# Altium PCB DIO_8SMA_8MCX.PcbDoc (part 2 of 9)
Units mm, origin at the board's own origin, x right, y up, seen from the top; angles counter-clockwise.
Board outline 222.9 x 100 mm, 6 copper layers (TopLayer, L2, L3, L4, L5, Bottom Layer), stack 1.492 mm thick; 542 components, 326 nets, 1968 pads, 1583 vias.
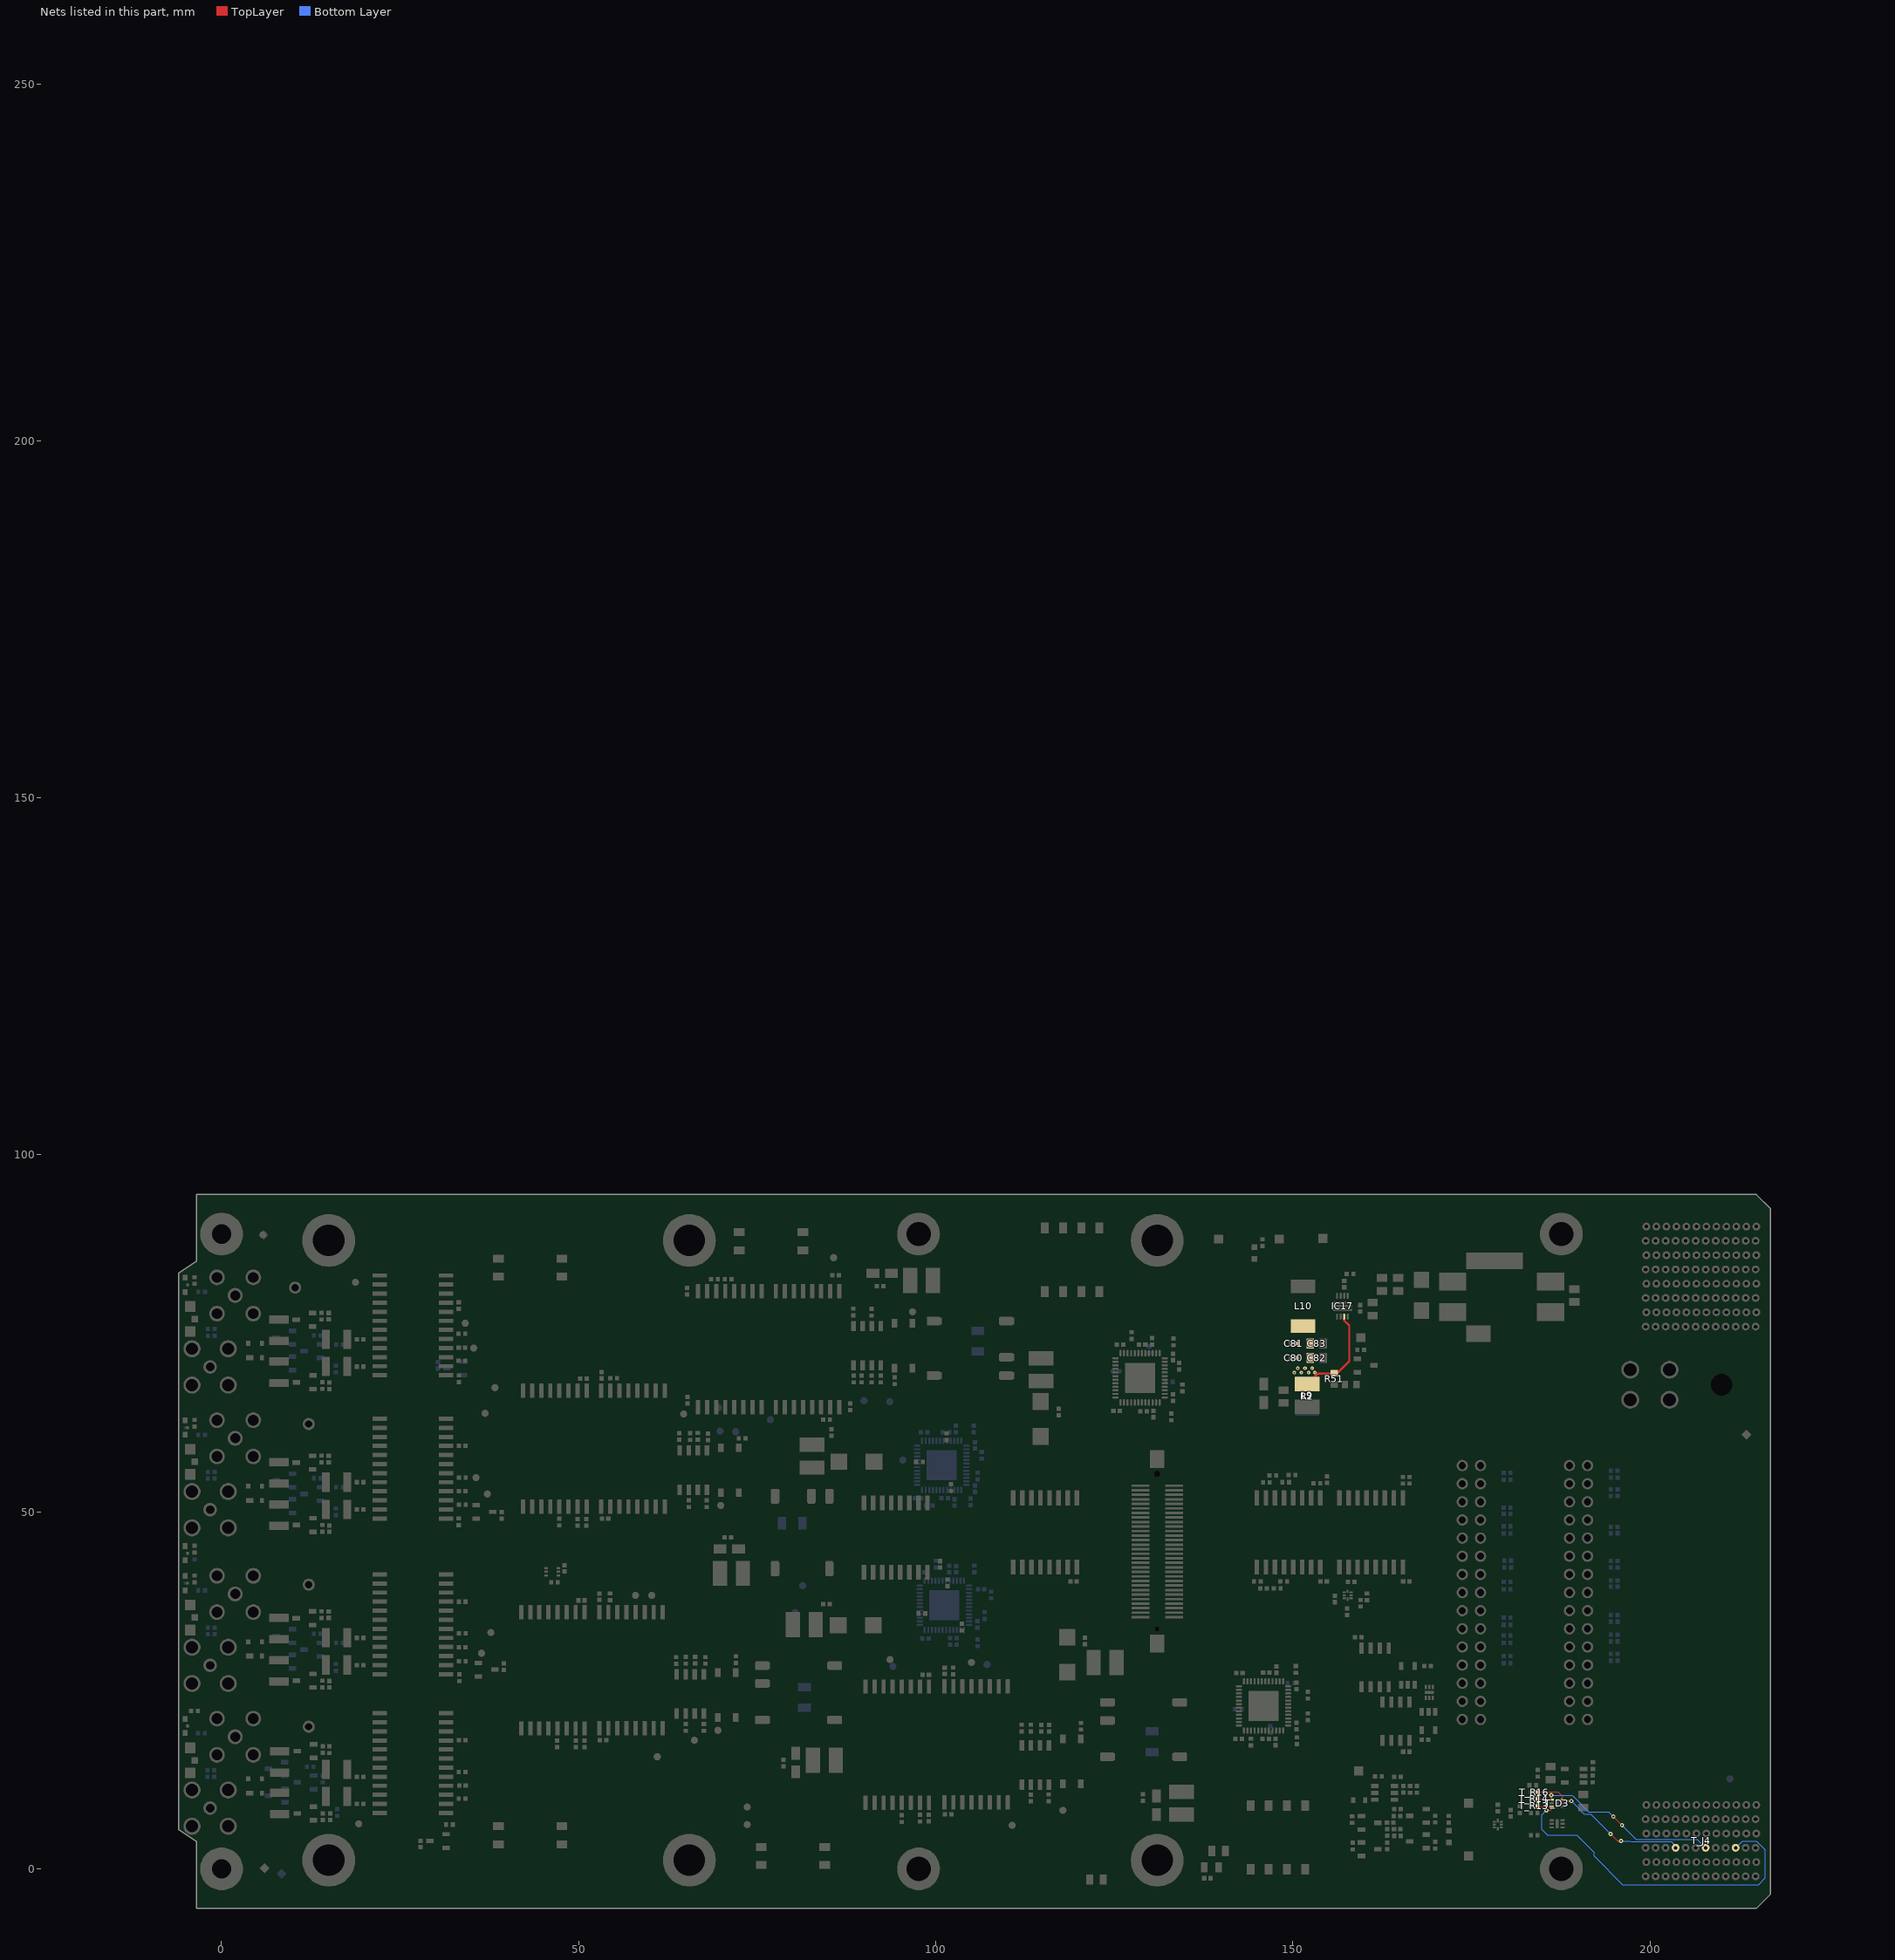
[diagram p6: the nets of this part, all layers, seen from the top]

## Components (designator, comment, footprint, x,y, rotation, side; value= is the part's Value field where it differs from the comment) (continued)
SW5D "Switch" SW_OMRON_A6S-2102-H 80,1.8 r180 top (schematic designator SW5)
T19A "BSS138LT1G" SOT95P240X110-3N 11.6,76.9 r180 top (schematic designator T19)
T19B "BSS138LT1G" SOT95P240X110-3N 11.6,56.9 r180 top (schematic designator T19)
T19C "BSS138LT1G" SOT95P240X110-3N 11.6,35.1 r180 top (schematic designator T19)
T19D "BSS138LT1G" SOT95P240X110-3N 11.744,16.5 r180 top (schematic designator T19)
T20A "BSS138LT1G" SOT95P240X110-3N 11.633,68.15 r180 top (schematic designator T20)
T20B "BSS138LT1G" SOT95P240X110-3N 11.633,48.15 r180 top (schematic designator T20)
T20C "BSS138LT1G" SOT95P240X110-3N 11.633,26.35 r180 top (schematic designator T20)
T20D "BSS138LT1G" SOT95P240X110-3N 11.733,7.75 r180 top (schematic designator T20)
T21A "BSS138LT1G" SOT95P240X110-3N 8.8,70.8 r180 bottom (schematic designator T21)
T21B "BSS138LT1G" SOT95P240X110-3N 8.8,50.8 r180 bottom (schematic designator T21)
T21C "BSS138LT1G" SOT95P240X110-3N 8.8,29 r180 bottom (schematic designator T21)
T21D "BSS138LT1G" SOT95P240X110-3N 7.733,10.25 r180 bottom (schematic designator T21)
T22A "BSS138LT1G" SOT95P240X110-3N 12.7,72.5 r180 bottom (schematic designator T22)
T22B "BSS138LT1G" SOT95P240X110-3N 12.7,52.5 r180 bottom (schematic designator T22)
T22C "BSS138LT1G" SOT95P240X110-3N 12.7,30.7 r180 bottom (schematic designator T22)
T22D "BSS138LT1G" SOT95P240X110-3N 11.742,12.11 r180 bottom (schematic designator T22)
T23A "BSS138LT1G" SOT95P240X110-3N 8.8,74.4 r180 bottom (schematic designator T23)
T23B "BSS138LT1G" SOT95P240X110-3N 8.8,54.4 r180 bottom (schematic designator T23)
T23C "BSS138LT1G" SOT95P240X110-3N 8.8,32.6 r180 bottom (schematic designator T23)
T23D "BSS138LT1G" SOT95P240X110-3N 7.7,14 r180 bottom (schematic designator T23)
T_B1 "Plated Hole" c600h270 0,0 r0 top locked
T_B2 "Plated Hole" c600h270 0,88.9 r0 top locked
T_C1 "4.7uF" CAPC2012X135N 190.7,9.5 r90 top
T_C2 "4.7uF" CAPC2012X135N 186.1,13.4 r270 top
T_C3 "100nF" CAPC1005X55N 168.85,28.4 r180 top
T_C4 "100nF" CAPC1005X55N 159.157,32.411 r0 top
T_C5 "100nF" CAPC1005X55N 168.5,18.1 r180 top
T_C6 "100nF" CAPC1005X55N 165.9,16.4 r0 top
T_C8 "100nF" CAPC1005X55N 47.998,42.086 r270 top
T_C9 "10uF" CAPC2012X95N 162.5,81.85 r270 top
T_C10 "10uF" CAPC2012X95N 164.75,81.85 r270 top
T_C11 "10uF" CAPC2012X95N 189.4,80.3 r270 top
T_C12 "22pF" CAPC1005X55N 138.046,-1.314 r0 top
T_C13 "10nF" CAPC1005X55N 165.467,11.15 r90 top
T_C14 "100nF" CAPC1005X55N 163.2,5.1 r90 top
T_C15 "100nF" CAPC1005X55N 163.634,6.48 r0 top
T_C16 "10nF" CAPC1005X55N 164.655,8.355 r180 top
T_C17 "10nF" CAPC1005X55N 164.6,7.4 r180 top
T_C18 "10nF" CAPC1005X55N 164.609,5.548 r180 top
T_C19 "10nF" CAPC1005X55N 164.64,4.613 r180 top
T_C20 "100nF" CAPC1005X55N 164.648,12.89 r180 top
T_C21 "100nF" CAPC1005X55N 163.2,3.2 r90 top
T_C22 "100nF" CAPC1005X55N 178.7,8.507 r270 top
T_C23 "100nF" CAPC1005X55N 180.5,7.8 r270 top
T_C24 "100nF" CAPC1005X55N 155.875,37.8 r90 top
T_C25 "100nF" CAPC1005X55N 157.6,36 r90 top
T_D1 "UCLAMP3305P.TCT" SON50P160X65_HS-7N 169.1,24.7 r270 top
T_D2 "UCLAMP3305P.TCT" SON50P160X65_HS-7N 187,6.3 r0 top
T_D3 "UCLAMP3305P.TCT" SON50P160X65_HS-7N 187,9.2 r0 top
T_D5 "SMBJ12A" DIOM5336X265N 168,80.35 r90 top
T_D6 "CDBU0520-HF" SOD-523F 159.286,9.624 r0 top
T_FL1 "10A/50VDC" FIL_MURATA_BNX02 179.245,80.068 r180 top
T_IC1 "TPS70933DBV" SOT95P280X145-5N 189.398,13.032 r180 top
T_IC2 "24AA02E48T-I/OT" SOT95P280X145-5N 166.1,27.1 r90 top
T_IC3 "24AA025E48-I/SN" SOIC127P600X175-8N 161.525,28.2 r90 top
T_IC4 "24AA02E48T-I/OT" SOT95P280X145-5N 169,20.7 r270 top
T_IC5 "24AA025E48-I/SN" SOIC127P600X175-8N 164.43,20.675 r270 top
T_IC6 "TMP112DQDRLRQ1" SOTFL50P160X60-6N 46.3,41.6 r0 top
T_IC7 "TPS3808G01DBVT" SOT95P280X145-6N 162.85,10.633 r0 top
T_IC8 "FXMA2102UMX" FXMA2102UMX 178.7,6.2 r270 top
T_IC9 "FXMA2102UMX" FXMA2102UMX 157.675,38.3 r90 top
T_J1 "" 3M_N2530-6002RB 190,38.7 r270 top locked
T_J2 "" 3M_N2530-6002RB 175,38.7 r270 top locked
T_J4 "P1" AMPHENOL_10052825-101LF 207.15,3.95 r90 top locked
T_J5 "P6" AMPHENOL_10052838-101LF 207.153,82.95 r90 top
T_J6 "Mini-Fit Jr.™" MOLEX_39-30-0040 200,67.8 r270 top
T_LD1 "Red" LED_AVAGO_HSMC-C120 -5.1,44.2 r90 top
T_LD2 "Green" LED_AVAGO_HSME-C120#1 -5.1,44.2 r270 bottom locked
T_LD3 "Green" LED_KINGBRIGHT_KPH-1608CGCK 144.6,86.275 r90 top
T_LD4 "Green" LED_KINGBRIGHT_KPH-1608CGCK 171.844,4.512 r90 top
T_M1 "PTH_3.4X6_BTKO" PTH-M3.4x6.0_BTKO 97.6,88.9 r180 top locked
T_M2 "PTH_3.4X6_BTKO" PTH-M3.4x6.0_BTKO 187.6,88.9 r180 top locked
T_M3 "PTH_3.4X6_BTKO" PTH-M3.4x6.0_BTKO 97.6,0 r0 top
T_M4 "PTH_3.4X6_BTKO" PTH-M3.4x6.0_BTKO 187.6,0 r0 top locked
T_R1 "1k6" RESC1005X40N -3.8,44.8 r270 top
T_R2 "0" RESC1005X40N 184.3,13.4 r90 top
T_R3 "10k" RESC1005X40N -3.8,43.8 r270 bottom
T_R4 "10k" RESC1005X40N 192,12.6 r90 top
T_R5 "1k6" RESC1005X40N 145.734,87.705 r90 top
T_R6 "1k6" RESC1005X40N 171.833,6.95 r90 top
T_R7 "3k9" RESC1005X40N 192.018,14.463 r270 top
T_R8 "10k" RESC1005X40N 161.979,12.923 r0 top
T_R13 "22" RESC1005X40N 183.8,8.8 r0 top
T_R14 "22" RESC1005X40N 183.8,9.8 r0 top
T_R15 "22" RESC1005X40N 183.8,4.7 r0 top
T_R16 "22" RESC1005X40N 183.804,10.726 r0 top
T_R17 "22" RESC1005X40N 183.8,7.8 r0 top
T_R18 "22" RESC1005X40N 183.6,11.7 r0 top
T_R19 "200" RESC1005X40N 181.8,8.3 r270 top
T_R25 "0" RESC1005X40N 46.609,40.119 r0 top
T_R26 "1M1" RESC2012X60N 138.6,0.2 r0 top
T_R27 "10M" RESC2113X55N 139.6,2.5 r0 top
T_R28 "10M" RESC2113X55N 122.5,-1.5 r0 top
T_R29 "100k" RESC1005X40N 167.357,11.132 r270 top
T_R30 "3k9" RESC1005X40N 166.419,11.14 r270 top
T_R31 "10k" RESC1005X40N 169.936,6.966 r90 top
T_R32 "10k" RESC1005X40N 169.955,3.32 r90 top
T_R33 "10k" RESC1005X40N 158.4,3.2 r270 top
T_R34 "10k" RESC1005X40N 158.3,6.9 r270 top
T_R35 "0" RESC1005X40N 195,55.75 r180 bottom
T_R36 "0" RESC1005X40N 194.997,53.121 r180 bottom
T_R37 "0" RESC1005X40N 195,47.9 r180 bottom
T_R38 "0" RESC1005X40N 195,42.2 r180 bottom
T_R39 "0" RESC1005X40N 195,40.4 r180 bottom
T_R40 "0" RESC1005X40N 195,34.6 r180 bottom
T_R41 "0" RESC1005X40N 195,32.8 r180 bottom
T_R42 "0" RESC1005X40N 195,30.116 r180 bottom
T_R43 "0" RESC1005X40N 180,55.476 r180 bottom
T_R44 "0" RESC1005X40N 180,49.7 r180 bottom
T_R45 "0" RESC1005X40N 180,47.976 r180 bottom
T_R46 "0" RESC1005X40N 180.1,42.2 r180 bottom
T_R47 "0" RESC1005X40N 180,40.176 r180 bottom
T_R48 "0" RESC1005X40N 180,34.176 r180 bottom
T_R49 "0" RESC1005X40N 180,32.676 r180 bottom
T_R50 "0" RESC1005X40N 180,29.8 r0 bottom
T_R51 "0" RESC1005X40N 195,54.8 r180 bottom
T_R52 "0" RESC1005X40N 195,52.2 r180 bottom
T_R53 "0" RESC1005X40N 195,47 r180 bottom
T_R54 "0" RESC1005X40N 195,43.125 r180 bottom
T_R55 "0" RESC1005X40N 195,39.5 r180 bottom
T_R56 "0" RESC1005X40N 195,35.55 r180 bottom
T_R57 "0" RESC1005X40N 194.995,31.858 r180 bottom
T_R58 "0" RESC1005X40N 195.005,29.168 r180 bottom
T_R59 "0" RESC1005X40N 180,54.476 r180 bottom
T_R60 "0" RESC1005X40N 180,50.6 r180 bottom
T_R61 "0" RESC1005X40N 180,46.976 r180 bottom
T_R62 "0" RESC1005X40N 180.1,43.15 r180 bottom
T_R63 "0" RESC1005X40N 180,39.176 r180 bottom
T_R64 "0" RESC1005X40N 180,35.176 r180 bottom
T_R65 "0" RESC1005X40N 180,31.626 r180 bottom
T_R66 "0" RESC1005X40N 180,28.8 r0 bottom
T_R67 "10k" RESC1005X40N 159.475,37.2 r90 top
T_R68 "10k" RESC1005X40N 160.375,38.1 r270 top
T_R69 "10k" RESC1005X40N 158.175,40.2 r180 top
T_T1 "BSS138LT1G" SOT95P240X110-3N 160.2,70.5 r0 top
T_T2 "BSS138LT1G" SOT95P240X110-3N 167.518,7.428 r180 top
T_T3 "BSS138LT1G" SOT95P240X110-3N 167.532,3.85 r180 top
T_T4 "BSS138LT1G" SOT95P240X110-3N 160.768,2.75 r0 top
T_T5 "BSS138LT1G" SOT95P240X110-3N 160.768,6.45 r0 top
T_TP1 "Test Point" TPS127 139.6,88.2 r0 top
T_TP2 "Test Point" TPS127 148.1,88.2 r0 top
T_TP3 "Test Point" TPS127 174.6,9.2 r90 top
T_TP4 "Test Point" TPS127 159.5,74.4 r90 top
T_TP5 "Test Point" TPS127 154.2,88.3 r0 top
T_TP6 "Test Point" TPS127 174.6,1.8 r90 top
T_TP8 "Test Point" TPS127 159.2,13.7 r90 top
TP1A "Plated Hole" c150h100 10.3,81.4 r90 top (schematic designator TP1)
TP1B "Plated Hole" c150h100 12.2,62.3 r90 top (schematic designator TP1)
TP1C "Plated Hole" c150h100 12.2,39.8 r90 top (schematic designator TP1)
TP1D "Plated Hole" c150h100 12.2,19.9 r90 top (schematic designator TP1)
U1 "PCF8574ADWR" DW0016A_M 115.3,47.1 r270 top
U2 "PCF8574ADWR" DW0016A_M 160.968,47.1 r270 top
U3 "PCF8574ADWR" DW0016A_M 94.4,46.4 r270 top
U4 "PCF8574ADWR" DW0016A_M 149.4,47.1 r270 top

## Footprints (in the part's own frame and the unit in brackets; to place one, negate y for a bottom-side part, rotate by r counter-clockwise, add the part's x,y. Pads: shape width x height; smd on the part's side, far side on the other; paste and mask are expansions set on the pad)
3M_N2530-6002RB [mm] "30 Contacts - Straight .100\" x .100\" Low Profile Four-Wall Header"
  round 1.6 hole 1: 1(-17.78,-1.27) 2(-17.78,1.27) 3(-15.24,-1.27) 4(-15.24,1.27) 5(-12.7,-1.27) 6(-12.7,1.27) 7(-10.16,-1.27) 8(-10.16,1.27) 9(-7.62,-1.27) 10(-7.62,1.27) 11(-5.08,-1.27) 12(-5.08,1.27) 13(-2.54,-1.27) 14(-2.54,1.27) 15(0,-1.27) 16(0,1.27) 17(2.54,-1.27) 18(2.54,1.27) 19(5.08,-1.27) 20(5.08,1.27) 21(7.62,-1.27) 22(7.62,1.27) 23(10.16,-1.27) 24(10.16,1.27) 25(12.7,-1.27) 26(12.7,1.27) 27(15.24,-1.27) 28(15.24,1.27) 29(17.78,-1.27) 30(17.78,1.27)
  silkscreen extent -22.71,-4.85 22.71,4.52, body extent -22.71,-4.11 22.71,4.52, height 9.91
9774120360 [mm] "SMT Steel Spacer with internal Thread M3, height 12mm"
  round 7.4 / inner round 0 / far side round 0 hole 4.4 unplated: 1(0,0)
  body extent -3,-3 3,3, height 12
AMPHENOL_919-383J-51A [mm] "50 Ohm, RF Connector, MCX Right Angle PCB Receptacle Jack"
  round 1.9 hole 1.2: 1(0,0)
  round 2.4 hole 1.7: 2(-2.54,2.54) 2(-2.54,-2.54) 2(2.54,2.54) 2(2.54,-2.54)
  silkscreen extent -3,-3 6.5,3, body extent -3,-3 6.5,3, height 6
AMPHENOL_10052825-101LF [mm] "72 Contacts, 2mm Pitch, 6 Columns, 4 Pairs per Column, 4 Walls, Right Angle Header"
  round 1.1 hole 0.5: A1(-5,-7.65) A2(-3,-7.75) A3(-1,-7.65) A4(1,-7.75) A5(3,-7.65) A6(5,-7.75) B1(-5,-6.25) B2(-3,-6.35) B3(-1,-6.25) B4(1,-6.35) B5(3,-6.25) B6(5,-6.35) C1(-5,-4.85) C2(-3,-4.95) C3(-1,-4.85) C4(1,-4.95) C5(3,-4.85) C6(5,-4.95) D1(-5,-3.45) D2(-3,-3.55) D3(-1,-3.45) D4(1,-3.55) D5(3,-3.45) D6(5,-3.55) E1(-5,-2.05) E2(-3,-2.15) E3(-1,-2.05) E4(1,-2.15) E5(3,-2.05) E6(5,-2.15) F1(-5,-0.65) F2(-3,-0.75) F3(-1,-0.65) F4(1,-0.75) F5(3,-0.65) F6(5,-0.75) G1(-5,0.75) G2(-3,0.65) G3(-1,0.75) G4(1,0.65) G5(3,0.75) G6(5,0.65) H1(-5,2.15) H2(-3,2.05) H3(-1,2.15) H4(1,2.05) H5(3,2.15) H6(5,2.05) I1(-5,3.55) I2(-3,3.45) I3(-1,3.55) I4(1,3.45) I5(3,3.55) I6(5,3.45) J1(-5,4.95) J2(-3,4.85) J3(-1,4.95) J4(1,4.85) J5(3,4.95) J6(5,4.85) K1(-5,6.35) K2(-3,6.25) K3(-1,6.35) K4(1,6.25) K5(3,6.35) K6(5,6.25) L1(-5,7.75) L2(-3,7.65) L3(-1,7.75) L4(1,7.65) L5(3,7.75) L6(5,7.65)
  silkscreen extent -6.95,-21.95 6.95,11.85, body extent -6.95,-21.95 6.95,11.85, height 15.25
AMPHENOL_10052838-101LF [mm] "96 Contacts, 2mm Pitch, 8 Columns, 4 Pairs per Column, 4 Walls, Right Angle Header"
  round 1.1 hole 0.5: A1(-7,-7.65) A2(-5,-7.75) A3(-3,-7.65) A4(-1,-7.75) A5(1,-7.65) A6(3,-7.75) A7(5,-7.65) A8(7,-7.75) B1(-7,-6.25) B2(-5,-6.35) B3(-3,-6.25) B4(-1,-6.35) B5(1,-6.25) B6(3,-6.35) B7(5,-6.25) B8(7,-6.35) C1(-7,-4.85) C2(-5,-4.95) C3(-3,-4.85) C4(-1,-4.95) C5(1,-4.85) C6(3,-4.95) C7(5,-4.85) C8(7,-4.95) D1(-7,-3.45) D2(-5,-3.55) D3(-3,-3.45) D4(-1,-3.55) D5(1,-3.45) D6(3,-3.55) D7(5,-3.45) D8(7,-3.55) E1(-7,-2.05) E2(-5,-2.15) E3(-3,-2.05) E4(-1,-2.15) E5(1,-2.05) E6(3,-2.15) E7(5,-2.05) E8(7,-2.15) F1(-7,-0.65) F2(-5,-0.75) F3(-3,-0.65) F4(-1,-0.75) F5(1,-0.65) F6(3,-0.75) F7(5,-0.65) F8(7,-0.75) G1(-7,0.75) G2(-5,0.65) G3(-3,0.75) G4(-1,0.65) G5(1,0.75) G6(3,0.65) G7(5,0.75) G8(7,0.65) H1(-7,2.15) H2(-5,2.05) H3(-3,2.15) H4(-1,2.05) H5(1,2.15) H6(3,2.05) H7(5,2.15) H8(7,2.05) I1(-7,3.55) I2(-5,3.45) I3(-3,3.55) I4(-1,3.45) I5(1,3.55) I6(3,3.45) I7(5,3.55) I8(7,3.45) J1(-7,4.95) J2(-5,4.85) J3(-3,4.95) J4(-1,4.85) J5(1,4.95) J6(3,4.85) J7(5,4.95) J8(7,4.85) K1(-7,6.35) K2(-5,6.25) K3(-3,6.35) K4(-1,6.25) K5(1,6.35) K6(3,6.25) K7(5,6.35) K8(7,6.25) L1(-7,7.75) L2(-5,7.65) L3(-3,7.75) L4(-1,7.65) L5(1,7.75) L6(3,7.65) L7(5,7.75) L8(7,7.65)
  silkscreen extent -8.95,-21.95 8.95,11.85, body extent -8.95,-21.95 8.95,11.85, height 15.25
APBA3010SURKSGC-F01 [mm]
  rect 1.5x1.5 smd: 1(1.75,0) 3(-1.75,0)
  rect 0.9x0.9 smd: 2(0,-0.65)
  silkscreen extent -2.5,-1.3 0.5,0.5, body extent -1.5,-0.5 1.5,1.5, height 1.02
C100 [mm] "1mm Diameter SMD Pad"
  round 1 smd paste-0.5: 1(0,0)
c150h100 [mm] "Plated Through Hole: Hole Dia.=1mm Pad Dia.=1.5mm, IPC-7251 Level C"
  round 1.7 hole 1: 1(0,0)
  silkscreen extent -1.2,-1.2 1.2,1.2
c600h270 [mm] "Plated Through Hole: Hole Dia.=2.7mm Pad Dia.=6.0mm"
  round 6 hole 2.7: 1(0,0)
CAPC1005X55N [mm] "Capacitor, Non-Polarized, Chip; 1.00mm L X 0.50mm W X 0.70mm H, IPC Medium Density"
  rect 0.62x0.62 smd: 1(-0.45,0) 2(0.45,0)
  body extent -0.52,-0.27 0.53,0.28, height 0.55
CAPC2012X95N [mm] "Chip Capacitor, Body 2.0x1.25mm, IPC Medium Density"
  rect 1.1x1.45 smd: 1(-0.9,0) 2(0.9,0)
  silkscreen extent 0,-0.58 0,0.58, body extent -1.05,-0.67 1.05,0.68, height 0.95
CAPC2012X135N [mm] "Chip Capacitor, Body 2.0x1.25mm, IPC Medium Density"
  rect 1.05x1.4 smd: 1(-0.9,0) 2(0.9,0)
  silkscreen extent 0,-0.57 0,0.58, body extent -1.05,-0.67 1.05,0.68, height 1.25
CAPMP3216X180N [mm] "Capacitor, Polarized, Molded  Body 3.2x1.6mm, IPC Medium Density"
  rect 1.8x1.25 smd: 1(-1.3,0) 2(1.3,0)
  silkscreen extent -2.4,-0.7 0,1.25, body extent -1.7,-0.9 1.7,0.9, height 1.6
CAPMP6032X280N [mm] "Capacitor, Polarized, Molded  Body 6.0x3.2mm, IPC Medium Density"
  rect 2.35x2.25 smd: 1(-2.45,0) 2(2.45,0)
  silkscreen extent -3.8,-1.75 3.15,1.9, body extent -3.15,-1.75 3.15,1.75, height 2.8
Delock_65848 [mm] "SMA Connector Delock 65848"
  round 2.1 hole 1.4: 1(0,0)
  round 2.2 hole 1.5: 2(-2.54,-2.54) 2(-2.54,2.54) 2(2.54,-2.54) 2(2.54,2.54)
  silkscreen extent -19.1,-4 3,4, body extent -19,-3.13 3,3.13, height 9.13
DIOM5336X265N [mm] "DO-214-AA/SMB Diode, Molded Body; 5.34mm L X 3.625mm W X 2.65mm H, IPC Medium Density"
  rect 2.3x2.15 smd: 1(-2.15,0) 2(2.15,0)
  silkscreen extent -3.92,-1.8 2.65,1.8, body extent -2.7,-1.95 2.7,1.95, height 2.4
DW0016A_M [mm] "SOIC, 16-Leads, Body 10.5x7.6mm, Pitch 1.27mm, IPC Low Density"
  rrect15% 2.1x0.65 smd: 1(-4.85,4.445) 2(-4.85,3.175) 3(-4.85,1.905) 4(-4.85,0.635) 5(-4.85,-0.635) 6(-4.85,-1.905) 7(-4.85,-3.175) 8(-4.85,-4.445) 9(4.85,-4.445) 10(4.85,-3.175) 11(4.85,-1.905) 12(4.85,-0.635) 13(4.85,0.635) 14(4.85,1.905) 15(4.85,3.175) 16(4.85,4.445)
  silkscreen extent -4.97,-5.25 3.4,5.45, body extent -5.14,-5.13 5.14,5.13, height 2.5
FIDUCIAL_TOP_C100-200 [mm] "Round Fiducial Target, Top Layer, 1.0mm, Top Solder 2.0mm, Keepout =2.0mm"
  round 1 smd paste-0.51 mask+0.5: 1(0,0)
  TopLayer keep-out circle w0.1: c0,0 r1
FIDUCIAL_TOP_S100-200 [mm] "Square Fiducial Target, Top Layer, 1.0mm, Top Solder 2.0mm, Keepout =2.0mm"
  rect 1x1 smd rot 45 paste-0.51 mask+0.5: 1(0,0)
  TopLayer keep-out region: 1.414,0 0,-1.414 -1.414,0 0,1.414
FIL_MURATA_BNX02 [mm] "Block Type EMIFIL LC Combined Type, BNX02* Series"
  rect 3.8x2.5 smd: 1(-6.85,2.1) 2(6.85,2.1) 3(-6.85,-2.2) 4(6.85,-2.2)
  rect 7.9x2.3 smd: 4(1,-5.1)
  rect 3.4x2.3 smd: 4(3.25,5.1)
  silkscreen extent -5.95,-4.45 7.77,5.05, body extent -6.05,-4.55 6.05,4.55, height 3.1
FP-52901-0674-MFG [mm]
  rect 0.35x2.5 smd paste+0 mask+0: 1(-9.207,-2.35) 2(-9.207,2.35) 3(-8.572,-2.35) 4(-8.572,2.35) 5(-7.938,-2.35) 6(-7.938,2.35) 7(-7.302,-2.35) 8(-7.302,2.35) 9(-6.667,-2.35) 10(-6.667,2.35) 11(-6.032,-2.35) 12(-6.033,2.35) 13(-5.397,-2.35) 14(-5.398,2.35) 15(-4.762,-2.35) 16(-4.763,2.35) 17(-4.127,-2.35) 18(-4.128,2.35) 19(-3.492,-2.35) 20(-3.493,2.35) 21(-2.857,-2.35) 22(-2.858,2.35) 23(-2.222,-2.35) 24(-2.223,2.35) 25(-1.587,-2.35) 26(-1.588,2.35) 27(-0.952,-2.35) 28(-0.953,2.35) 29(-0.317,-2.35) 30(-0.318,2.35) 31(0.318,-2.35) 32(0.317,2.35) 33(0.953,-2.35) 34(0.952,2.35) 35(1.588,-2.35) 36(1.587,2.35) 37(2.223,-2.35) 38(2.222,2.35) 39(2.858,-2.35) 40(2.857,2.35) 41(3.493,-2.35) 42(3.492,2.35) 43(4.128,-2.35) 44(4.127,2.35) 45(4.763,-2.35) 46(4.762,2.35) 47(5.398,-2.35) 48(5.397,2.35) 49(6.033,-2.35) 50(6.032,2.35) 51(6.667,-2.35) 52(6.667,2.35) 53(7.302,-2.35) 54(7.302,2.35) 55(7.938,-2.35) 56(7.938,2.35) 57(8.572,-2.35) 58(8.572,2.35) 59(9.207,-2.35) 60(9.207,2.35)
  rect 2.5x2 smd paste+0 mask+0: MECH1(-12.91,0) MECH2(12.91,0)
  round 0.9 hole 0.9 unplated paste-2539.97 mask+0: ""(-10.86,0)
  round 0.7 hole 0.7 unplated paste-2539.97 mask+0: ""(10.86,0)
  silkscreen extent -13.58,-4.35 13.58,3.3, body extent -14.26,-3.7 14.26,3.7, height 0.25
FXMA2102UMX [mm]
  rect 0.55x0.25 smd: 1(-0.53,0)
  rect 0.25x0.45 smd: 2(-0.4,-0.475) 3(0,-0.475) 4(0.4,-0.475) 6(0.4,0.475) 7(0,0.475) 8(-0.4,0.475)
  rect 0.45x0.25 smd: 5(0.58,0)
  silkscreen extent -1.1,-0.05 -1,0.05, body extent -0.71,-0.61 0.71,0.61, height 0.5
IND_MURATA-PS_8400 [mm] "Miniature Surface Mount Power Inductors, 4.5mm L X 3.3mm W X 2.9mm H, MURATA 8400 Series"
  rect 2x3.5 smd: 1(-1.6,0) 2(1.6,0)
  silkscreen extent -0.3,-1.8 0.3,1.8, body extent -2.4,-1.8 2.4,1.8, height 2.9
IND_TDK_SPM6530 [mm] "SMD Inductor, 7.1mm L X 6.5mm W X 3mm H, TDK SPM6530 Series"
  rect 1.85x3.4 smd: 1(-2.775,0) 2(2.775,0)
  silkscreen extent -3.5,-3.2 3.5,3.2, body extent -3.6,-3.2 3.6,3.2, height 3.1
LED_AVAGO_HSMC-C120 [mm] "Red Chip LED, 2-Leads, Body 1.7x1.1mm, Side Emitting Package"
  rect 0.8x0.7 smd: 1(-1,0) 2(1,0)
  rect 0.4x0.4 smd: 3(0,-0.35)
  silkscreen extent -1.12,-0.92 0.42,0.8, body extent -0.85,-0.3 0.85,0.8, height 0.7
LED_AVAGO_HSME-C120#1 [mm] "Green Chip LED, 2-Leads, Body 1.7x1.1mm, Side Emitting Package"
  rect 0.8x0.7 smd: 1(-1,0) 2(1,0)
  rect 0.4x0.4 smd: 3(0,-0.35)
  silkscreen extent -1.12,-0.92 0.42,0.8, body extent -0.85,-0.3 0.85,0.8, height 0.7
LED_AVAGO_HSME-C120#2 [mm] "Green Chip LED, 2-Leads, Body 1.7x1.1mm, Side Emitting Package"
  rect 0.8x0.7 smd: 1(-1,0) 2(1,0)
  rect 0.4x0.4 smd: 3(0,0)
  silkscreen extent -1.12,-0.92 0.42,0.8, body extent -0.85,-0.3 0.85,0.8, height 0.7
LED_KINGBRIGHT_KPH-1608CGCK [mm] "SMT Green LED, Case 0603, Body L 1.6 x W 0.8mm H 0.65mm"
  rect 0.8x0.8 smd: 1(-0.825,0) 2(0.825,0)
  silkscreen extent -1.82,-0.4 0.08,0.4, body extent -0.8,-0.4 0.8,0.4, height 0.65
MOLEX_39-30-0040 [mm] "4.20mm (.165\") Pitch Mini-Fit Jr. Header, Dual Row, Right Angle with Snap-in Plastic Peg PCB Lock, 4 Circuits"
  round 2.5 hole 1.8: 1(-2.1,2.75) 2(2.1,2.75) 3(-2.1,-2.75) 4(2.1,-2.75)
  round 1 hole 3 unplated mask+1: 5(0,10.05)
  silkscreen extent -5.2,-1.24 4.8,16.65, body extent -5.2,-3.28 4.8,16.65, height 11.4
PTH-M3.4x6.0_BTKO [mm]
  round 6 hole 3.4: 1(0,0)
  Bottom Layer keep-out region: -5,-3.05 -5,7.3 5,7.3 5,-3.05 1.173,-3.05 1.173,-3.056 2.504,-2.108 3.211,-0.635 3.118,0.997 2.247,2.38 0.817,3.169 -0.817,3.169 -2.247,2.38 -3.118,0.997 -3.211,-0.635 -2.504,-2.108 -1.173,-3.056 -1.173,-3.056 -1.173,-3.05
QFN50P700X700X100-49N-S420 [mm] "QFN, 0.50mm Pitch, Square; 48 Pin, 7.00mm L X 7.00mm W X 1mm H body (W/Thermal Tab 4.2mm X 4.2mm), IPC Medium Density"
  oval 0.9x0.3 smd: 1(-3.45,2.75) 2(-3.45,2.25) 3(-3.45,1.75) 4(-3.45,1.25) 5(-3.45,0.75) 6(-3.45,0.25) 7(-3.45,-0.25) 8(-3.45,-0.75) 9(-3.45,-1.25) 10(-3.45,-1.75) 11(-3.45,-2.25) 12(-3.45,-2.75) 25(3.45,-2.75) 26(3.45,-2.25) 27(3.45,-1.75) 28(3.45,-1.25) 29(3.45,-0.75) 30(3.45,-0.25) 31(3.45,0.25) 32(3.45,0.75) 33(3.45,1.25) 34(3.45,1.75) 35(3.45,2.25) 36(3.45,2.75)
  oval 0.3x0.9 smd: 13(-2.75,-3.45) 14(-2.25,-3.45) 15(-1.75,-3.45) 16(-1.25,-3.45) 17(-0.75,-3.45) 18(-0.25,-3.45) 19(0.25,-3.45) 20(0.75,-3.45) 21(1.25,-3.45) 22(1.75,-3.45) 23(2.25,-3.45) 24(2.75,-3.45) 37(2.75,3.45) 38(2.25,3.45) 39(1.75,3.45) 40(1.25,3.45) 41(0.75,3.45) 42(0.25,3.45) 43(-0.25,3.45) 44(-0.75,3.45) 45(-1.25,3.45) 46(-1.75,3.45) 47(-2.25,3.45) 48(-2.75,3.45)
  rect 4.2x4.2 smd: 49(0,0)
  silkscreen extent -4.02,-3.5 3.5,3.59, body extent -3.5,-3.5 3.5,3.5, height 1
R1SE-1205_H2-R [mm]
  rect 1.2x1.8 smd: 1(-3.81,-5.1) 2(-1.27,-5.1) 4(3.81,-5.1) 5(3.81,5.1) 8(-3.81,5.1)
  silkscreen extent -6.38,-6.8 6.38,5.35, body extent -6.38,-5.55 6.38,5.55, height 6.95
RESC1005X40N [mm] "Chip Resistor, EIA 0402, Metric 1005, Body 1.0x0.5mm, IPC Medium Density"
  rect 0.58x0.62 smd: 1(-0.47,0) 2(0.47,0)
  body extent -0.52,-0.27 0.53,0.28, height 0.4
RESC1608X55N [mm] "Chip Resistor, EIA 0603, Metric 1608, Body 1.6x0.8mm, IPC Medium Density"
  rect 0.9x1 smd: 1(-0.8,0) 2(0.8,0)
  body extent -0.87,-0.47 0.88,0.48, height 0.55
RESC2012X60N [mm] "Chip Resistor, EIA 0805, Metric 2012, Body 2.0x1.2mm, IPC Medium Density"
  rect 0.95x1.4 smd: 1(-1,0) 2(1,0)
  silkscreen extent 0,-0.55 0,0.55, body extent -1.1,-0.67 1.1,0.68, height 0.6
RESC2113X55N [mm] "Chip Resistor, EIA 0805, Metric 2113, Body 2.05x1.3mm, IPC Medium Density"
  rect 1x1.45 smd: 1(-0.95,0) 2(0.95,0)
  silkscreen extent 0,-0.55 0,0.55, body extent -1,-0.62 1,0.63, height 0.55
RESC3216X65N [mm] "Chip Resistor, EIA 1206, Metric 3216, Body 3.2x1.6mm, IPC Medium Density"
  rect 1.15x1.8 smd: 1(-1.45,0) 2(1.45,0)
  silkscreen extent -0.5,-0.8 0.5,0.8, body extent -1.67,-0.87 1.68,0.88, height 0.65
RESC3225X70N [mm] "Chip Resistor, EIA 1210, Metric 3225, Body 3.2x2.5mm, IPC Medium Density"
  rect 1.15x2.7 smd: 1(-1.5,0) 2(1.5,0)
  silkscreen extent -0.55,-1.25 0.55,1.25, body extent -1.7,-1.35 1.7,1.35, height 0.7
RESC4532X70N [mm]
  rect 1.15x3.4 smd: 1(-2.15,0) 2(2.15,0)
  silkscreen extent -1.15,-1.7 1.15,1.7, body extent -2.35,-1.7 2.35,1.7, height 0.7
SOD-523F [mm] "Small Outline Diode Flat Lead (SOD-523F), Body; 1.80mm L X 1mm W X 0.85mm H"
  rect 0.6x0.8 smd: 1(-0.85,0) 2(0.85,0)
  silkscreen extent -1.87,-0.5 0.2,0.52, body extent -0.91,-0.5 0.89,0.5, height 0.85
SOIC127P594X363-8N [mm] "SOIC, 1.27mm pitch; 8  pin, 3.91mm W X 4.88mm L, IPC Medium Density"
  rect 1.45x0.65 smd: 1(-2.75,1.905) 2(-2.75,0.635) 3(-2.75,-0.635) 4(-2.75,-1.905) 5(2.75,-1.905) 6(2.75,-0.635) 7(2.75,0.635) 8(2.75,1.905)
  silkscreen extent -3.32,-2.45 1.7,2.87, body extent -3.1,-2.5 3.1,2.5, height 3.63
SOIC127P600X175-8N [mm] "SOIC 8, Pitch 1.27mm - Body 4x5mm, IPC Medium Density"
  rect 1.55x0.6 smd: 1(-2.7,1.905) 2(-2.7,0.635) 3(-2.7,-0.635) 4(-2.7,-1.905) 5(2.7,-1.905) 6(2.7,-0.635) 7(2.7,0.635) 8(2.7,1.905)
  silkscreen extent -2.52,-2.5 1.55,2.88, body extent -3.1,-2.5 3.1,2.5, height 1.75
SOIC127P1030X265-24N [mm] "SOIC 24, Pitch 1.27mm - Body 7.6x15.6mm, IPC Medium Density"
  rect 2x0.6 smd: 1(-4.65,6.985) 2(-4.65,5.715) 3(-4.65,4.445) 4(-4.65,3.175) 5(-4.65,1.905) 6(-4.65,0.635) 7(-4.65,-0.635) 8(-4.65,-1.905) 9(-4.65,-3.175) 10(-4.65,-4.445) 11(-4.65,-5.715) 12(-4.65,-6.985) 13(4.65,-6.985) 14(4.65,-5.715) 15(4.65,-4.445) 16(4.65,-3.175) 17(4.65,-1.905) 18(4.65,-0.635) 19(4.65,0.635) 20(4.65,1.905) 21(4.65,3.175) 22(4.65,4.445) 23(4.65,5.715) 24(4.65,6.985)
  silkscreen extent -4.5,-7.8 3.3,7.9, body extent -5.18,-7.8 5.18,7.8, height 1.68
SOIC127P1720X265-16N [mm] "SOIC, 16-Leads, Body 10,30x14,00mm, Pitch 1,27mm, IPC Medium Density"
  rrect16% 2x0.6 smd: 1(-8.125,4.445) 2(-8.125,3.175) 3(-8.125,1.905) 4(-8.125,0.635) 5(-8.125,-0.635) 6(-8.125,-1.905) 7(-8.125,-3.175) 8(-8.125,-4.445) 9(8.125,-4.445) 10(8.125,-3.175) 11(8.125,-1.905) 12(8.125,-0.635) 13(8.125,0.635) 14(8.125,1.905) 15(8.125,3.175) 16(8.125,4.445)
  silkscreen extent -8.25,-5.2 6.7,5.42, body extent -8.62,-5.2 8.62,5.2, height 2.65
SON50P160X65_HS-7N [mm] "SON, 6-Leads, Body 1,60x1,60mm, Pitch 0,50mm, Thermal Pad 1,18x0,28mm, IPC Medium Density"
  rect 0.63x0.3 smd: 1(-0.76,0.5) 2(-0.76,0) 3(-0.76,-0.5) 4(0.76,-0.5) 5(0.76,0) 6(0.76,0.5)
  rect 0.45x1.3 smd: 7(0,0)
  silkscreen extent -1.27,-0.98 0.85,1.02, body extent -0.85,-0.85 0.85,0.85, height 0.65
SOT95P237X112-3N [mm] "SOT, 0.95mm, pitch; 3 pin,1.30mm W X 2.92mm L X 1.12mm H body, IPC Medium Density"
  rect 1.05x0.6 smd: 1(-1.15,0.95) 2(-1.15,-0.95) 3(1.15,0)
  silkscreen extent -1.53,-1.45 0.3,1.87, body extent -1.25,-1.5 1.25,1.5, height 1.1
SOT95P240X110-3N [mm] "SOT23 3-Leads, Pitch 0.95mm, Body 1.3x2.9mm, IPC Medium Density"
  rect 1.05x0.65 smd: 1(-1.15,0.95) 2(-1.15,-0.95) 3(1.15,0)
  silkscreen extent -1.53,-1.45 0.3,1.92, body extent -1.25,-1.5 1.25,1.5, height 1.1
SOT95P280X145-5N [mm] "SOT, 0.95mm pitch; 5 pin, 1.60mm W X 2.90mm L X 1.45mm H body, IPC Medium Density"
  rect 1.1x0.6 smd: 1(-1.3,0.95) 2(-1.3,0) 3(-1.3,-0.95) 4(1.3,-0.95) 5(1.3,0.95)
  silkscreen extent -1.73,-1.45 0.43,1.87, body extent -1.4,-1.5 1.4,1.5, height 1.45
SOT95P280X145-6N [mm] "SOT23, 6-Leads, Body 1.6x3.0mm, Pitch 0.95mm, IPC Medium Density"
  rect 1.05x0.6 smd: 1(-1.35,0.95) 2(-1.35,0) 3(-1.35,-0.95) 4(1.35,-0.95) 5(1.35,0) 6(1.35,0.95)
  silkscreen extent -2.37,-1.55 0.45,1.79, body extent -1.4,-1.5 1.4,1.5, height 1.45
SOT190P238X100-4N [mm] "SOT143, 4-Leads, Body 2,90x2,38mm, Pitch 1,90mm, IPC Medium Density"
  rect 0.7x1 smd: 1(-1,0.75)
  rect 0.7x0.6 smd: 2(-1,-0.95) 3(1,-0.95) 4(1,0.95)
  silkscreen extent -1.05,-1.5 0.7,1.6, body extent -0.95,-1.5 0.95,1.5, height 1
SOTFL50P160X60-6N [mm]
  rect 0.475x0.3 smd: 1(-0.838,0.5) 2(-0.838,0) 3(-0.838,-0.5) 4(0.838,-0.5) 5(0.838,0) 6(0.838,0.5)
  silkscreen extent -1.07,-0.8 0.25,0.9, body extent -0.8,-0.8 0.8,0.8, height 0.6
SW_OMRON_A6S-2102-H [mm] "Pitch 2.54mm, Body 6.2x6.4mm, 2 Ways SPST Surface-Mounting DIP Switch, OMRON A6S-H"
  rect 1.5x1.1 smd: 1(-4.45,1.27) 2(-4.45,-1.27) 3(4.45,-1.27) 4(4.45,1.27)
  silkscreen extent -3.2,-3.11 3.2,3.11, body extent -4.9,-3.01 4.9,3.01, height 3.97
SW_OMRON_A6S-4102-H [mm] "Pitch 2.54mm, Body 11.3x6.4mm, 4 Ways SPST Surface-Mounting DIP Switch, OMRON A6S-H"
  rect 1.5x1.1 smd: 1(-4.45,3.81) 2(-4.45,1.27) 3(-4.45,-1.27) 4(-4.45,-3.81) 5(4.45,-3.81) 6(4.45,-1.27) 7(4.45,1.27) 8(4.45,3.81)
  silkscreen extent -3.2,-5.65 3.2,5.65, body extent -4.9,-5.55 4.9,5.55, height 3.97
TEXAS_RGX0011A [mm] "TEXAS Case Style (R-VQFN-HR-N11), 0.50mm Pitch, 11-pin, 2.00mm W X 3.00mm L X 1.00mm H Body"
  oval 2.75x0.3 smd: 1(0,0.5) 2(0,0) 3(0,-0.5)
  oval 0.3x0.85 smd: 4(-0.75,-1.45) 5(-0.25,-1.45) 6(0.25,-1.45) 7(0.75,-1.45) 8(0.75,1.45) 9(0.25,1.45) 10(-0.25,1.45) 11(-0.75,1.45)
  silkscreen extent -2.07,0.38 -1.82,0.62, body extent -1,-1.5 1,1.5, height 1
TOSHIBA_11-4M1S [mm] "SOIC,1.27mm Pitch; 4 pin, TOSHIBA Case (5mm Creepage)"
  rect 1.2x0.8 smd: 1(-3.15,1.27) 3(-3.15,-1.27) 4(3.15,-1.27) 6(3.15,1.27)
  TopLayer keep-out region: -2.3,-2.2 2.3,-2.2 2.3,2.2 -2.3,2.2
  silkscreen extent -3.25,-1.98 2.15,2.4, body extent -3.7,-1.98 3.7,1.97, height 2.3
TPS127 [mm] "1.27 x  1.27mm SMD Test Point Area"
  rect 1.27x1.27 smd paste-1.27: 1(0,0)
  silkscreen extent -0.94,-0.94 0.94,0.94
WPME-FISM_SMT-8_L13.2W11.4H7.25 [mm] "Power Module, SMT, body 13.20x11.40mm"
  rect 1x2.1 smd: 1(-3.81,-5.05) 2(-1.27,-5.05) 4(3.81,-5.05) 5(3.81,5.05) 8(-3.81,5.05)
  silkscreen extent -6.85,-5.33 6.85,4.38, body extent -6.6,-5.7 6.6,5.7, height 7.25

## Part data
B4A B4B B4C B4D B5A B5B B5C B5D B6A B6B B6C B6D B7A B7B B7C B7D B8A B8B B8C B8D B9A B9B B9C B9D B10A B10B B10C B10D B11A B11B B11C B11D B12A B12B B12C B12D: library part SMD_PAD_D1MM, "Through Hole Pad", Author="CERN DEM JLC", Component Type="Standard (No BOM)", ComponentHeight=0mm, CreateDate=10.10.2017, Family="SMD Pad", HelpURL=Undefined, LatestRevisionDate=10.10.2017, Mounted=No, PackageDescription="1mm Diameter SMD Pad", Part Description="1mm Diameter SMD Pad", Part Number=SMD_PAD_D1MM, Pin Count=1, Sense=No, SMD=No, Socket=No, Status=None
C1: library part CC0402_1NF_50V_10%_X7R, "Non-polarised capacitor", Case=0402, Manufacturer=GENERIC, Manufacturer1 ComponentHeight=0.55mm, Manufacturer1 Example=PHYCOMP, Manufacturer1 Part Number=223858715623, Tolerance=±10%, Voltage=50V, Author="CERN DEM JLC", Component Type=Standard, CreateDate=2007-12-03, HelpURL=\\cern.ch\dfs\Applications\Altium\Datasheets\CC0402_X7R_PHYCOMP.pdf, LatestRevisionDate=2007-12-03, Manufacturer Part Number=CC0402_1NF_50V_10%_X7R, Mounted=Yes, Part Description="SMD Multilayer Chip Ceramic Capacitor", Part Number=CC0402_1NF_50V_10%_X7R, Pin Count=2, Sense=No, SMD=Yes, Socket=No, Status="Not Recommended", TC=X7R
C2 C3 C15 C16 C17 C18 C19 C20 C21 C22 C23 C24 C25 C26 C27 C32A C32B C32C C32D C33A C33B C33C C33D C41A C41B C41C C41D C43A C43B C43C C43D C54 C55 C56A C56B C56C C56D C64 C65 C75 C76A C76B C76C C76D C77A C77B C77C C77D C78A C78B C78C C78D C80 C81 C86 C88A C88B C88C C88D C92 C95A C95B C95C C95D C96 C97 C100A C100B C100C C100D C106 C107 C108 C109 C110 C111 C112 C113 C114 C115 C116 C117 C118 T_C3 T_C4 T_C5 T_C6 T_C8 T_C14 T_C15 T_C20 T_C21 T_C22 T_C23 T_C24 T_C25: library part CC0402_100NF_50V_10%_X7R, "Non-polarised capacitor", Case=0402, Manufacturer=GENERIC, Manufacturer1 ComponentHeight=0.55mm, Manufacturer1 Example=MURATA, Manufacturer1 Part Number=GRM155R71H104KE14D, Tolerance=±10%, Voltage=50V, Author="CERN DEM MR", Component Type=Standard, CreateDate=30.06.2017, HelpURL=\\cern.ch\dfs\Applications\Altium\Datasheets\CC0402_MURATA_GRM155R71H104KE14D.pdf, LatestRevisionDate=30.06.2017, Manufacturer Part Number=CC0402_100NF_50V_10%_X7R, Mounted=Yes, Part Description="SMD Multilayer Chip Ceramic Capacitor", Part Number=CC0402_100NF_50V_10%_X7R, Pin Count=2, Sense=No, SMD=Yes, Socket=No, Status=None, TC=X7R
C39A C39B C39C C39D: library part CTE6032-28_1UF_50V_10%, "Polarised capacitor", Case=C, Manufacturer=GENERIC, Manufacturer1 ComponentHeight=2.8mm, Manufacturer1 Example=AVX, Manufacturer1 Part Number=TAJC105K050R, Tolerance=±10%, Voltage=50V, Author="CERN DEM JLC", Component Type=Standard, CreateDate=03.12.2007, HelpURL=\\cern.ch\dfs\Applications\Altium\Datasheets\CTE_AVX_TAJ.pdf, LatestRevisionDate=03.12.2007, Manufacturer Part Number=CTE6032-28_1UF_50V_10%, Mounted=Yes, Part Description="Solid Tantalum Chip Capacitor", Part Number=CTE6032-28_1UF_50V_10%, Pin Count=2, Sense=No, SMD=Yes, Socket=No, Status=Preferred
C42A C42B C42C C42D: library part CTE3216-18_4.7UF_16V_10%_LESR2000, "Polarised capacitor", Case=A, Manufacturer=GENERIC, Manufacturer1 ComponentHeight=1.8mm, Manufacturer1 Example=AVX, Manufacturer1 Part Number=TPSA475K016R2000, Tolerance=±10%, Voltage=16V, Author="CERN DEM JLC", Component Type=Standard, CreateDate=03.09.2012, HelpURL=\\cern.ch\dfs\Applications\Altium\Datasheets\CTE-LESR_AVX_TPS.pdf, LatestRevisionDate=03.09.2012, Manufacturer Part Number=CTE3216-18_4.7UF_16V_10%_LESR2000, Mounted=Yes, Part Description="Low ESR 2R0 Solid Tantalum Chip Capacitor", Part Number=CTE3216-18_4.7UF_16V_10%_LESR2000, Pin Count=2, Sense=No, SMD=Yes, Socket=No, Status=Preferred
C82 C83 C84 C87: library part CC0805_22UF_16V_10%_X5R, "Non-polarised capacitor", Case=0805, Manufacturer=GENERIC, Manufacturer1 ComponentHeight=1.35mm, Manufacturer1 Example=TDK, Manufacturer1 Part Number=C2012X5R1C226KT, Tolerance=±10%, Voltage=16V, Author="CERN DEM JLC", Component Type=Standard, CreateDate=25.10.2012, HelpURL=\\cern.ch\dfs\Applications\Altium\Datasheets\CC0805_X5R_TDK_C.pdf, LatestRevisionDate=25.10.2012, Manufacturer Part Number=CC0805_22UF_16V_10%_X5R, Mounted=Yes, Part Description="SMD Multilayer Chip Ceramic Capacitor", Part Number=CC0805_22UF_16V_10%_X5R, Pin Count=2, Sense=No, SMD=Yes, Socket=No, Status=Preferred, TC=X5R
C85: library part CTE3216-18_10UF_16V_20%_AVX_TCJ, "Polarised capacitor", Case=A, Manufacturer=AVX, Manufacturer Part Number=TCJA106M016R0200, Tolerance=±20%, Voltage=16V, Author="CERN DEM JLC", Component Type=Standard, ComponentHeight=1.8mm, CreateDate=29.03.2012, HelpURL=\\cern.ch\dfs\Applications\Altium\Datasheets\CTE_AVX_TCJ.pdf, LatestRevisionDate=29.03.2012, Mounted=Yes, Part Description="ESR 0R200 Tantalum Solid Electrolytic Chip Capacitor with Conductive Polymer Electrode", Part Number=CTE3216-18_10UF_16V_20%_AVX_TCJ, Pin Count=2, Sense=No, SMD=Yes, Socket=No, Status=Preferred
D3A D3B D3C D3D: library part CMP-004-00039-1, "D1213A-02SR Series 400 mW Uni-Directional Surface Mount TVS Diode - SOT-143", Case/Package=SOT-143, Max Operating Temperature=150°C, Min Operating Temperature=-65°C, Mounting Technology="Surface Mount", Pins=4
FTG1 FTG4: library part FIDUCIAL_TARGET_C100-200, "Fiducial Target", Author="CERN DEM JLC", Component Type="Standard (No BOM)", ComponentHeight=0mm, CreateDate=09.02.2010, Family=Fiducial, HelpURL=Undefined, LatestRevisionDate=04.04.2012, Mounted=No, PackageDescription="Round Fiducial Target, Top Layer, 1.0mm, Top Solder 2.0mm, Keepout =2.0mm", Part Description="Round Fiducial Target, Top Layer, 1.0mm, Top Solder 2.0mm, Keepout =2.0mm", Part Number=FIDUCIAL_TARGET_C100-200, Pin Count=1, Sense=No, SMD=Yes, Socket=No, Status=None
FTG2 FTG3 FTG5 FTG6: library part FIDUCIAL_TARGET_S100-200, "Fiducial Target", Author="CERN DEM JLC", Component Type="Standard (No BOM)", ComponentHeight=0mm, CreateDate=09.02.2010, Family=Fiducial, HelpURL=Undefined, LatestRevisionDate=04.04.2012, Mounted=No, PackageDescription="Square Fiducial Target, Top Layer, 1.0mm, Top Solder 2.0mm, Keepout =2.0mm", Part Description="Square Fiducial Target, Top Layer, 1.0mm, Top Solder 2.0mm, Keepout =2.0mm", Part Number=FIDUCIAL_TARGET_S100-200, Pin Count=1, Sense=No, SMD=Yes, Socket=No, Status=None
IC1A IC1B IC1C IC1D: library part CMP-019-00162-2, "Dc-Dc Converter, 5V, 0.2A Rohs Compliant: Yes", Isolation Voltage=3kV, Manufacturer="Wurth Elektronik", Max Supply Voltage=13.2V, Output Current=200mA, Height=7.25mm, Length=13.2mm, Manufacturer Part Search=1769205241, Width=11.4mm
IC3 IC13 IC32 IC46: "4-Channel Half-Duplex M-LVDS Line Transceiver", Case=QFN48, Manufacturer="TEXAS INSTRUMENTS", Author="CERN DEM JLC", Bonding=No, Component Type=Standard, ComponentHeight=1mm, CreateDate=17.03.2011, Device=SN65MLVD040RGZT, HelpURL=\\cern.ch\dfs\Applications\Altium\Datasheets\SN65MLVD040RGZT.pdf, LatestRevisionDate=17.03.2011, Manufacturer Part Number=SN65MLVD040RGZT, Mounted=Yes, PackageDescription="QFN, 0.50mm Pitch, Square; 48 Pin, 7.00mm L X 7.00mm W X 1mm H body (W/Thermal Tab 4.2mm X 4.2mm), IPC Medium Density", Part Description="4-Channel Half-Duplex M-LVDS Line Transceiver", Part Number=SN65MLVD040RGZT, Pin Count=49, PressFit=No, Sense=No, SMD=Yes, Socket=No
IC10A IC10B IC10C IC10D: "Dual Optocoupler", Case=SOIC8, Manufacturer="ON SEMICONDUCTOR", Author="CERN DEM JLC", Bonding=No, Component Type=Standard, ComponentHeight=3.63mm, CreateDate=03.10.2017, Device=MOCD207M, HelpURL=\\cern.ch\dfs\Applications\Altium\Datasheets\MOCD207M.pdf, LatestRevisionDate=03.10.2017, Manufacturer Part Number=MOCD207M, Mounted=Yes, PackageDescription="SOIC, 1.27mm Pitch; 8 Pin, 3.91mm W X 4.88mm L, IPC Medium Density", Part Description="Dual-Channel Phototransistor Output Optocoupler", Part Number=MOCD207M, Pin Count=8, PressFit=No, Sense=No, SMD=Yes, Socket=No
IC12A IC12B IC12C IC12D: library part CMP-019-00163-2, "1W DC/DC-Converter 'ECONOLINE' SMD 2kV unreg; V. In: 12; V. Out: 05; mA. Out: 200", Case/Package=SMD/SMT, Manufacturer="RECOM Power", Max Operating Temperature=100°C, Max Power Dissipation=1W, Max Supply Voltage=13.2V, Min Operating Temperature=-40°C, Output Voltage=5V, Height=6.7mm, Manufacturer Part Number=R1SE-1205/H2-R, Mounting Technology="Surface Mount"
IC17: "3V-17V 2A Step-Down Converter, High Accuracy, With DCS-Control", Case=QFN14, Manufacturer="TEXAS INSTRUMENTS", Author="CERN DEM MR", Bonding=No, Component Type=Standard, ComponentHeight=1mm, CreateDate=08.02.2019, Device=TPS62148RGX, HelpURL=\\cern.ch\dfs\Applications\Altium\Datasheets\TPS62148RGX.pdf, LatestRevisionDate=08.02.2019, Manufacturer Part Number=TPS62148RGX, Mounted=Yes, PackageDescription="TEXAS Case Style (R-VQFN-HR-N11), 0.50mm Pitch, 11 Pin, 2.00mm W X 3.00mm L X 1.00mm H body", Part Description="3V-17V 2A Step-Down Converter, High Accuracy, with DCS-Control", Part Number=TPS62148RGX, Pin Count=11, PressFit=No, Sense=No, SMD=Yes, Socket=No
IC29A IC29B IC29C IC29D: library part VMON_MCP810, "3.075V Microcontroller Supervisory Circuit With Push-Pull Output", Case=SOT23, Manufacturer="MICROCHIP TECHNOLOGY", Author=GK, Bonding=No, Component Type=Standard, ComponentHeight=1.12mm, CreateDate=16.06.2011, Device=MCP810T-315I/TT, HelpURL=\\cern.ch\dfs\Applications\Altium\Datasheets\MCP809T-315I-TT.pdf, LatestRevisionDate=16.06.2011, Manufacturer Part Number=MCP810T-315I/TT, Mounted=Yes, PackageDescription="SOT, 0.95mm, pitch; 3 pin,1.30mm W X 2.92mm L X 1.12mm H body, IPC Medium Density", Part Description="3.075V Microcontroller Supervisory Circuit With Push-Pull Output", Part Number=MCP810T-315I/TT, Pin Count=3, PressFit=No, Sense=No, SMD=Yes, Socket=No
IC50A IC50B IC50C IC50D: "25 Ohms Octal Bus Transceiver With 3-State Outputs", Case=SOIC24, Manufacturer="TEXAS INSTRUMENTS", Author="CERN DEM JLC", Bonding=No, Component Type=Standard, ComponentHeight=2.65mm, CreateDate=03.04.2017, Device=SN74ABTH25245DW, HelpURL=\\cern.ch\dfs\Applications\Altium\Datasheets\SN74ABTH25245DW.pdf, LatestRevisionDate=03.04.2017, Manufacturer Part Number=SN74ABTH25245DW, Mounted=Yes, PackageDescription="SOIC 24, Pitch 1.27mm - Body 7.6x15.6mm, IPC Medium Density", Part Description="25 Ohms Octal Bus Transceiver with 3-State Outputs", Part Number=SN74ABTH25245DW, Pin Count=24, PressFit=No, Sense=No, SMD=Yes, Socket=No
IC52A IC52B IC52C IC52D IC53A IC53B IC53C IC53D: library part CMP-015-00012-2, "Highest isolation rating, dual-channel, 2/0, reinforced digital isolator 16-SOIC -55 to 125", Case/Package=SOIC, Manufacturer="Texas Instruments", Max Operating Temperature=125°C, Max Supply Voltage=5.5V, Min Operating Temperature=-55°C, Min Supply Voltage=2.25V, Manufacturer Part Number=ISO7820DWW, Pins=16
IC54A IC54B IC54C IC54D: "Single Optocoupler", Case=SOIC4, Manufacturer=TOSHIBA, Author="CERN DEM JMW", Bonding=No, Component Type=Standard, ComponentHeight=2.3mm, CreateDate=05.10.2015, Device=TLP183, HelpURL=\\cern.ch\dfs\Applications\Altium\Datasheets\TLP183.pdf, LatestRevisionDate=04.09.2017, Manufacturer Part Number=TLP183, Mounted=Yes, PackageDescription="SOIC, 1.27mm Pitch; 4 Pin, TOSHIBA Case (5mm Creepage)", Part Description="Photocoupler InGaAs Infrared LED & Photo-Transistor", Part Number=TLP183, Pin Count=4, PressFit=No, Sense=No, SMD=Yes, Socket=No
J1: library part CMP-002-04665-1, "Conn Board to Board RCP 60 POS 0.635mm Solder ST SMD Embossed T/R", Manufacturer=Molex, Max Operating Temperature=105°C, Min Operating Temperature=-55°C, Gender=Receptacle, Manufacutrer Part Number=52901-0674, Mounting Technology="Surface Mount", Pins=60
J15A J15B J15C J15D: library part CMP-002-04652-5, "SMA connector Delock 65848"
J16A J16B J16C J16D: library part AMPHENOL_919-383J-51A, Manufacturer=AMPHENOL, Manufacturer Part Number=919-383J-51A, Author="CERN DEM BC", Component Type=Standard, ComponentHeight=6mm, CreateDate=31.01.2019, Family=MCX, HelpURL=\\cern.ch\dfs\Applications\Altium\Datasheets\AMPHENOL_919-383J-51A.pdf, LatestRevisionDate=31.01.2019, Mounted=Yes, Part Description="50 Ohm, RF Connector, MCX Right Angle PCB Receptacle Jack", Part Number=AMPHENOL_919-383J-51A, Pin Count=5, PressFit=No, Sense=No, SMD=No, Socket=No, Status=None
L5A L5B L5C L5D L9 L11A L11B L11C L11D: library part IND_10UH_10%_MURATA-PS_8400, "Inductor With Core", Manufacturer="MURATA POWER SOLUTIONS", Manufacturer Part Number=84103C, Power=950mA, Resistance=0.24R, Tolerance=±10%, Author="CERN DEM JLC", Component Type=Standard, ComponentHeight=2.9mm, CreateDate=02.07.2012, HelpURL=\\cern.ch\dfs\Applications\Altium\Datasheets\IND_MURATA-PS_8400.pdf, LatestRevisionDate=02.07.2012, Mounted=Yes, Part Number=IND_10UH_10%_MURATA-PS_8400, Pin Count=2, Sense=No, SMD=Yes, Socket=No
  L5A L5B L5C L5D L11A L11B L11C L11D: Part Description="Miniature Surface Mount Power Inductor (8400 Serie)", Status=None
  L9: Part Description="Miniature Surface Mount Power Inductor (8400 Series)"
L10: library part IND_1.5UH_20%_TDK_SPM6530, "Inductor With Core", Manufacturer=TDK, Manufacturer Part Number=SPM6530T-1R5M100, Power=11A, Resistance=0.0097R, Tolerance=±20%, Author="CERN DEM MR", Component Type=Standard, ComponentHeight=3mm, CreateDate=08.11.2016, HelpURL=\\cern.ch\dfs\Applications\Altium\Datasheets\IND_TDK_SPM6530.pdf, LatestRevisionDate=08.11.2016, Mounted=Yes, Part Description="SMD Inductor for Power Circuits (Wound Metal), SPM Series", Part Number=IND_1.5UH_20%_TDK_SPM6530, Pin Count=2, Sense=No, SMD=Yes, Socket=No
LD15A LD15B LD15C LD15D LD16A LD16B LD16C LD16D T_LD2: library part LED_AVAGO_HSME-C120, "LED Green 1C 2A", Manufacturer="AVAGO TECHNOLOGIES", Manufacturer Part Number=HSME-C120, Author="CERN DEM JMW", Bonding=No, Color=Green, Component Type=Standard, ComponentHeight=0.7mm, ComponentLink1Description="Design Guide", ComponentLink1URL=\\cern.ch\dfs\Applications\Altium\Datasheets\LED_AVAGO_HSME-C110_DESIGN-GUIDE.pdf, CreateDate=22.07.2009, HelpURL=\\cern.ch\dfs\Applications\Altium\Datasheets\LED_AVAGO_HSME-C120.pdf, LatestRevisionDate=20.06.2012, Mounted=Yes, PackageDescription="Green Chip LED, 2-Leads, Body 1.7x1.1mm, Side Emitting Package", Part Description="High Performance Right Angle Chip Green LED", Part Number=LED_AVAGO_HSME-C120, Pin Count=2, PressFit=No, Sense=No, SMD=Yes, Socket=No
LD17A LD17B LD17C LD17D: library part CMP-007-00060-1, "Dual Color LED, Hyper Red/super Bright Green, Water Clear, 2mm", Case/Package=SMD/SMT, Forward Voltage=2.2V, Manufacturer=Kingbright, Max Operating Temperature=85°C, Min Operating Temperature=-40°C, Manufacturer Part Number=APBA3010SURKSGC-F01, Mounting Technology="Surface Mount"
MP1 MP2 MP3 MP4 MP5 MP6: library part CMP-00028-00025-1, "Spacer, Steel, With Internal Thread M3, 12MM Length, 6 Mm Outer Diameter", Case/Package=SMD/SMT, Manufacturer="Wurth Elektronik", Max Operating Temperature=150°C, Min Operating Temperature=-55°C, Manufacturer Part Number=9774120360R, Mounting Technology=External
R1 R3 R4 R7 R8 R9 R10 R11 R17 R18 R19 R20 R21 R22 R23 R24 R25 R55 R58 R59 R60 R85 R89 R90 R91 R92 R93 R94 R95 R96 R101 R206A R206B R206C R206D R210A R210B R210C R210D R218A R218B R218C R218D R219A R219B R219C R219D R220A R220B R220C R220D R223A R223B R223C R223D T_R3 T_R4 T_R8 T_R31 T_R32 T_R33 T_R34 T_R67 T_R68 T_R69: library part R0402_10K_1%_0.0625W_100PPM, "Resistor - 1%", Case=0402, Manufacturer=GENERIC, Manufacturer1 ComponentHeight=0.4mm, Manufacturer1 Example="YAGEO PHYCOMP", Manufacturer1 Part Number=232270671003L, Power=0.0625W, Tolerance=±1%, Author="CERN DEM JLC", Component Type=Standard, CreateDate=03.12.2007, HelpURL=\\cern.ch\dfs\Applications\Altium\Datasheets\R0402_Phycomp_RC0402.pdf, LatestRevisionDate=17.10.2012, Manufacturer Part Number=R0402_10K_1%_0.0625W_100PPM, Mounted=Yes, Part Description="General Purpose Thick Film Chip Resistor", Part Number=R0402_10K_1%_0.0625W_100PPM, Pin Count=2, Sense=No, SMD=Yes, Socket=No, TC=±100ppm/°C
  R1 R3 R4 R7 R8 R9 R10 R11 R17 R18 R19 R20 R21 R22 R23 R24 R25 R55 R58 R59 R60 R85 R89 R90 R91 R92 R93 R94 R95 R96 R101 R206A R206B R206C R206D R210A R210B R210C R210D R218A R218B R218C R218D R219A R219B R219C R219D R220A R220B R220C R220D R223A R223B R223C R223D: Status="Not recommended"
  T_R3 T_R4 T_R8 T_R31 T_R32 T_R33 T_R34 T_R67 T_R68 T_R69: PressFit=No, Status="Not Recommended"
R2: library part CMP-009-04025-1, "Zero Ohm Resistor, 1812 [4532 Metric], Thick Film, 750 mW, 2 A, Surface Mount, ERJU12 Series, 4.5 mm", Case/Package=1812, Manufacturer=Panasonic, Max Operating Temperature=155°C, Min Operating Temperature=-55°C, Manufacturer Part Number=ERJ-U120R00U, Mounting Technology="Surface Mount"
R5 R6 R12 R13 R15 R26 R27 R31 R36 R42 R61 R64 R71 R76 R82 R87A R87B R87C R87D R88A R88B R88C R88D R103 R106 R114 R121 R129 R216A R216B R216C R216D: library part R0402_100R_1%_0.1W_100PPM, "Resistor - 1%", Case=0402, Manufacturer=GENERIC, Manufacturer1 ComponentHeight=0.4mm, Manufacturer1 Example=PANASONIC, Manufacturer1 Part Number=ERJ2RKF1000X, Manufacturer Part Number=R0402_100R_1%_0.1W_100PPM_50V, Power=0.1W, Tolerance=±1%, Voltage=50V, Author="CERN DEM JLC", Component Type=Standard, CreateDate=12.12.2013, HelpURL=\\cern.ch\dfs\Applications\Altium\Datasheets\R0402_PANASONIC_ERJ2RK.pdf, LatestRevisionDate=03.03.2015, Mounted=Yes, Part Description="General Purpose Thick Film Chip Resistor", Part Number=R0402_100R_1%_0.1W_100PPM, Pin Count=2, Sense=No, SMD=Yes, Socket=No, Status="Not recommended", TC=±100ppm/°C
R29A R29B R29C R29D R34A R34B R34C R34D R212A R212B R212C R212D R213A R213B R213C R213D R215A R215B R215C R215D R217A R217B R217C R217D R221A R221B R221C R221D: library part R0402_510R_1%_0.0625W_100PPM, "Resistor - 1%", Case=0402, Manufacturer=GENERIC, Manufacturer1 ComponentHeight=0.4mm, Manufacturer1 Example="YAGEO PHYCOMP", Manufacturer1 Part Number=232270675101L, Power=0.0625W, Tolerance=±1%, Author="CERN DEM JLC", Component Type=Standard, CreateDate=03.12.2007, HelpURL=\\cern.ch\dfs\Applications\Altium\Datasheets\R0402_Phycomp_RC0402.pdf, LatestRevisionDate=17.10.2012, Manufacturer Part Number=R0402_510R_1%_0.0625W_100PPM, Mounted=Yes, Part Description="General Purpose Thick Film Chip Resistor", Part Number=R0402_510R_1%_0.0625W_100PPM, Pin Count=2, Sense=No, SMD=Yes, Socket=No, Status="Not recommended", TC=±100ppm/°C
R51: library part R0603_560K_1%_0.1W_100PPM, "Resistor - 1%", Case=0603, Manufacturer=GENERIC, Manufacturer1 ComponentHeight=0.55mm, Manufacturer1 Example="NIC COMPONENT", Manufacturer1 Part Number=NRC06F5603TRF, Power=0.1W, Tolerance=±1%, Author="CERN DEM JLC", Component Type=Standard, CreateDate=03.12.2007, HelpURL=\\cern.ch\dfs\Applications\Altium\Datasheets\R0603_NIC_NRC.pdf, LatestRevisionDate=13.03.2008, Manufacturer Part Number=R0603_560K_1%_0.1W_100PPM, Mounted=Yes, Part Description="General Purpose Thick Film Chip Resistor", Part Number=R0603_560K_1%_0.1W_100PPM, Pin Count=2, PressFit=No, Sense=No, SMD=Yes, Socket=No, Status=Preferred, TC=±100ppm/°C
R53: library part R0603_150K_0.1%_0.063W_10PPM, "Resistor - 0.1%", Case=0603, Manufacturer=GENERIC, Manufacturer1 ComponentHeight=0.5mm, Manufacturer1 Example="TYCO HOLSWORTHY", Manufacturer1 Part Number=RN73C1J150KBTDF, Power=0.063W, Tolerance=±0.1%, Author="CERN DEM JLC", Component Type=Standard, CreateDate=03.12.2007, HelpURL=\\cern.ch\dfs\Applications\Altium\Datasheets\R0603_Tyco_RN73.pdf, LatestRevisionDate=13.03.2008, Manufacturer Part Number=R0603_150K_0.1%_0.063W_10PPM, Mounted=Yes, Part Description="Thin Film Chip Resistor", Part Number=R0603_150K_0.1%_0.063W_10PPM, Pin Count=2, PressFit=No, Sense=No, SMD=Yes, Socket=No, Status="Not Recommended", TC=±10ppm
R56 R86 R209A R209B R209C R209D R214A R214B R214C R214D T_R2 T_R25 T_R35 T_R36 T_R37 T_R38 T_R39 T_R40 T_R41 T_R42 T_R43 T_R44 T_R45 T_R46 T_R47 T_R48 T_R49 T_R50 T_R51 T_R52 T_R53 T_R54 T_R55 T_R56 T_R57 T_R58 T_R59 T_R60 T_R61 T_R62 T_R63 T_R64 T_R65 T_R66: library part R0402_0R_JUMPER, "Resistor", Case=0402, Manufacturer=GENERIC, Manufacturer1 ComponentHeight=0.4mm, Manufacturer1 Example="YAGEO PHYCOMP", Manufacturer1 Part Number=232270591001L, Author="CERN DEM JLC", Component Type=Standard, CreateDate=03.12.2007, HelpURL=\\cern.ch\dfs\Applications\Altium\Datasheets\R0402_Phycomp_RC0402.pdf, LatestRevisionDate=17.10.2012, Manufacturer Part Number=R0402_0R_JUMPER, Mounted=Yes, Part Description="1A (0.05R Max DC Resistance) Zero Ohm Jumper", Part Number=R0402_0R_JUMPER, Pin Count=2, Sense=No, SMD=Yes, Socket=No
  R56 R86 R209A R209B R209C R209D R214A R214B R214C R214D T_R2 T_R35 T_R36 T_R37 T_R38 T_R39 T_R40 T_R41 T_R42 T_R43 T_R44 T_R45 T_R46 T_R47 T_R48 T_R49 T_R50 T_R51 T_R52 T_R53 T_R54 T_R55 T_R56 T_R57 T_R58 T_R59 T_R60 T_R61 T_R62 T_R63 T_R64 T_R65 T_R66: PressFit=No, Status="Not Recommended"
  T_R25: Status="Not recommended"
R68 T_R29: library part R0402_100K_1%_0.0625W_100PPM, "Resistor - 1%", Case=0402, Manufacturer=GENERIC, Manufacturer1 ComponentHeight=0.4mm, Manufacturer1 Example="YAGEO PHYCOMP", Manufacturer1 Part Number=232270671004L, Power=0.0625W, Tolerance=±1%, Author="CERN DEM JLC", Component Type=Standard, CreateDate=03.12.2007, HelpURL=\\cern.ch\dfs\Applications\Altium\Datasheets\R0402_Phycomp_RC0402.pdf, LatestRevisionDate=17.10.2012, Manufacturer Part Number=R0402_100K_1%_0.0625W_100PPM, Mounted=Yes, Part Description="General Purpose Thick Film Chip Resistor", Part Number=R0402_100K_1%_0.0625W_100PPM, Pin Count=2, PressFit=No, Sense=No, SMD=Yes, Socket=No, Status="Not Recommended", TC=±100ppm/°C
R69A R69B R69C R69D: library part R1206_0R_JUMPER, "Resistor", Case=1206, Manufacturer=GENERIC, Manufacturer1 ComponentHeight=0.65mm, Manufacturer1 Example="NIC COMPONENT", Manufacturer1 Part Number=NRC12Z0, Author="CERN DEM JLC", Component Type=Standard, CreateDate=03.12.2007, HelpURL=\\cern.ch\dfs\Applications\Altium\Datasheets\R1206_NIC_NRC.pdf, LatestRevisionDate=13.03.2008, Manufacturer Part Number=R1206_0R_JUMPER, Mounted=Yes, Part Description="2A (0.05R Max DC Resistance) Zero Ohm Jumper", Part Number=R1206_0R_JUMPER, Pin Count=2, PressFit=No, Sense=No, SMD=Yes, Socket=No, Status=Preferred
R202A R202B R202C R202D: library part R0402_NO-VALUE, "Resistor", Case=0402, Author="CERN DEM JLC", Component Type=Standard, CreateDate=03.12.2007, HelpURL=Undefined, LatestRevisionDate=13.03.2008, Manufacturer=Undefined, Manufacturer1 ComponentHeight=Undefined, Manufacturer1 Example=Undefined, Manufacturer1 Part Number=Undefined, Manufacturer Part Number=R0402_NO-VALUE, Mounted=No, Part Description="Reserved Footprint For a 0402 (1005) Chip Resistor", Part Number=R0402_NO-VALUE, Pin Count=2, PressFit=No, Sense=No, SMD=Yes, Socket=No, Status=None